# Altium PCB PCB_GTV3.5.PcbDoc (part 10 of 11)
Units mil, origin at the board's own origin, x right, y up, seen from the top; angles counter-clockwise.
Board outline 8070.87 x 4881.89 mil, 4 copper layers (Top Layer, GND, PWR, Bottom Layer), stack 61.653 mil thick; 490 components, 296 nets, 1533 pads, 845 vias.
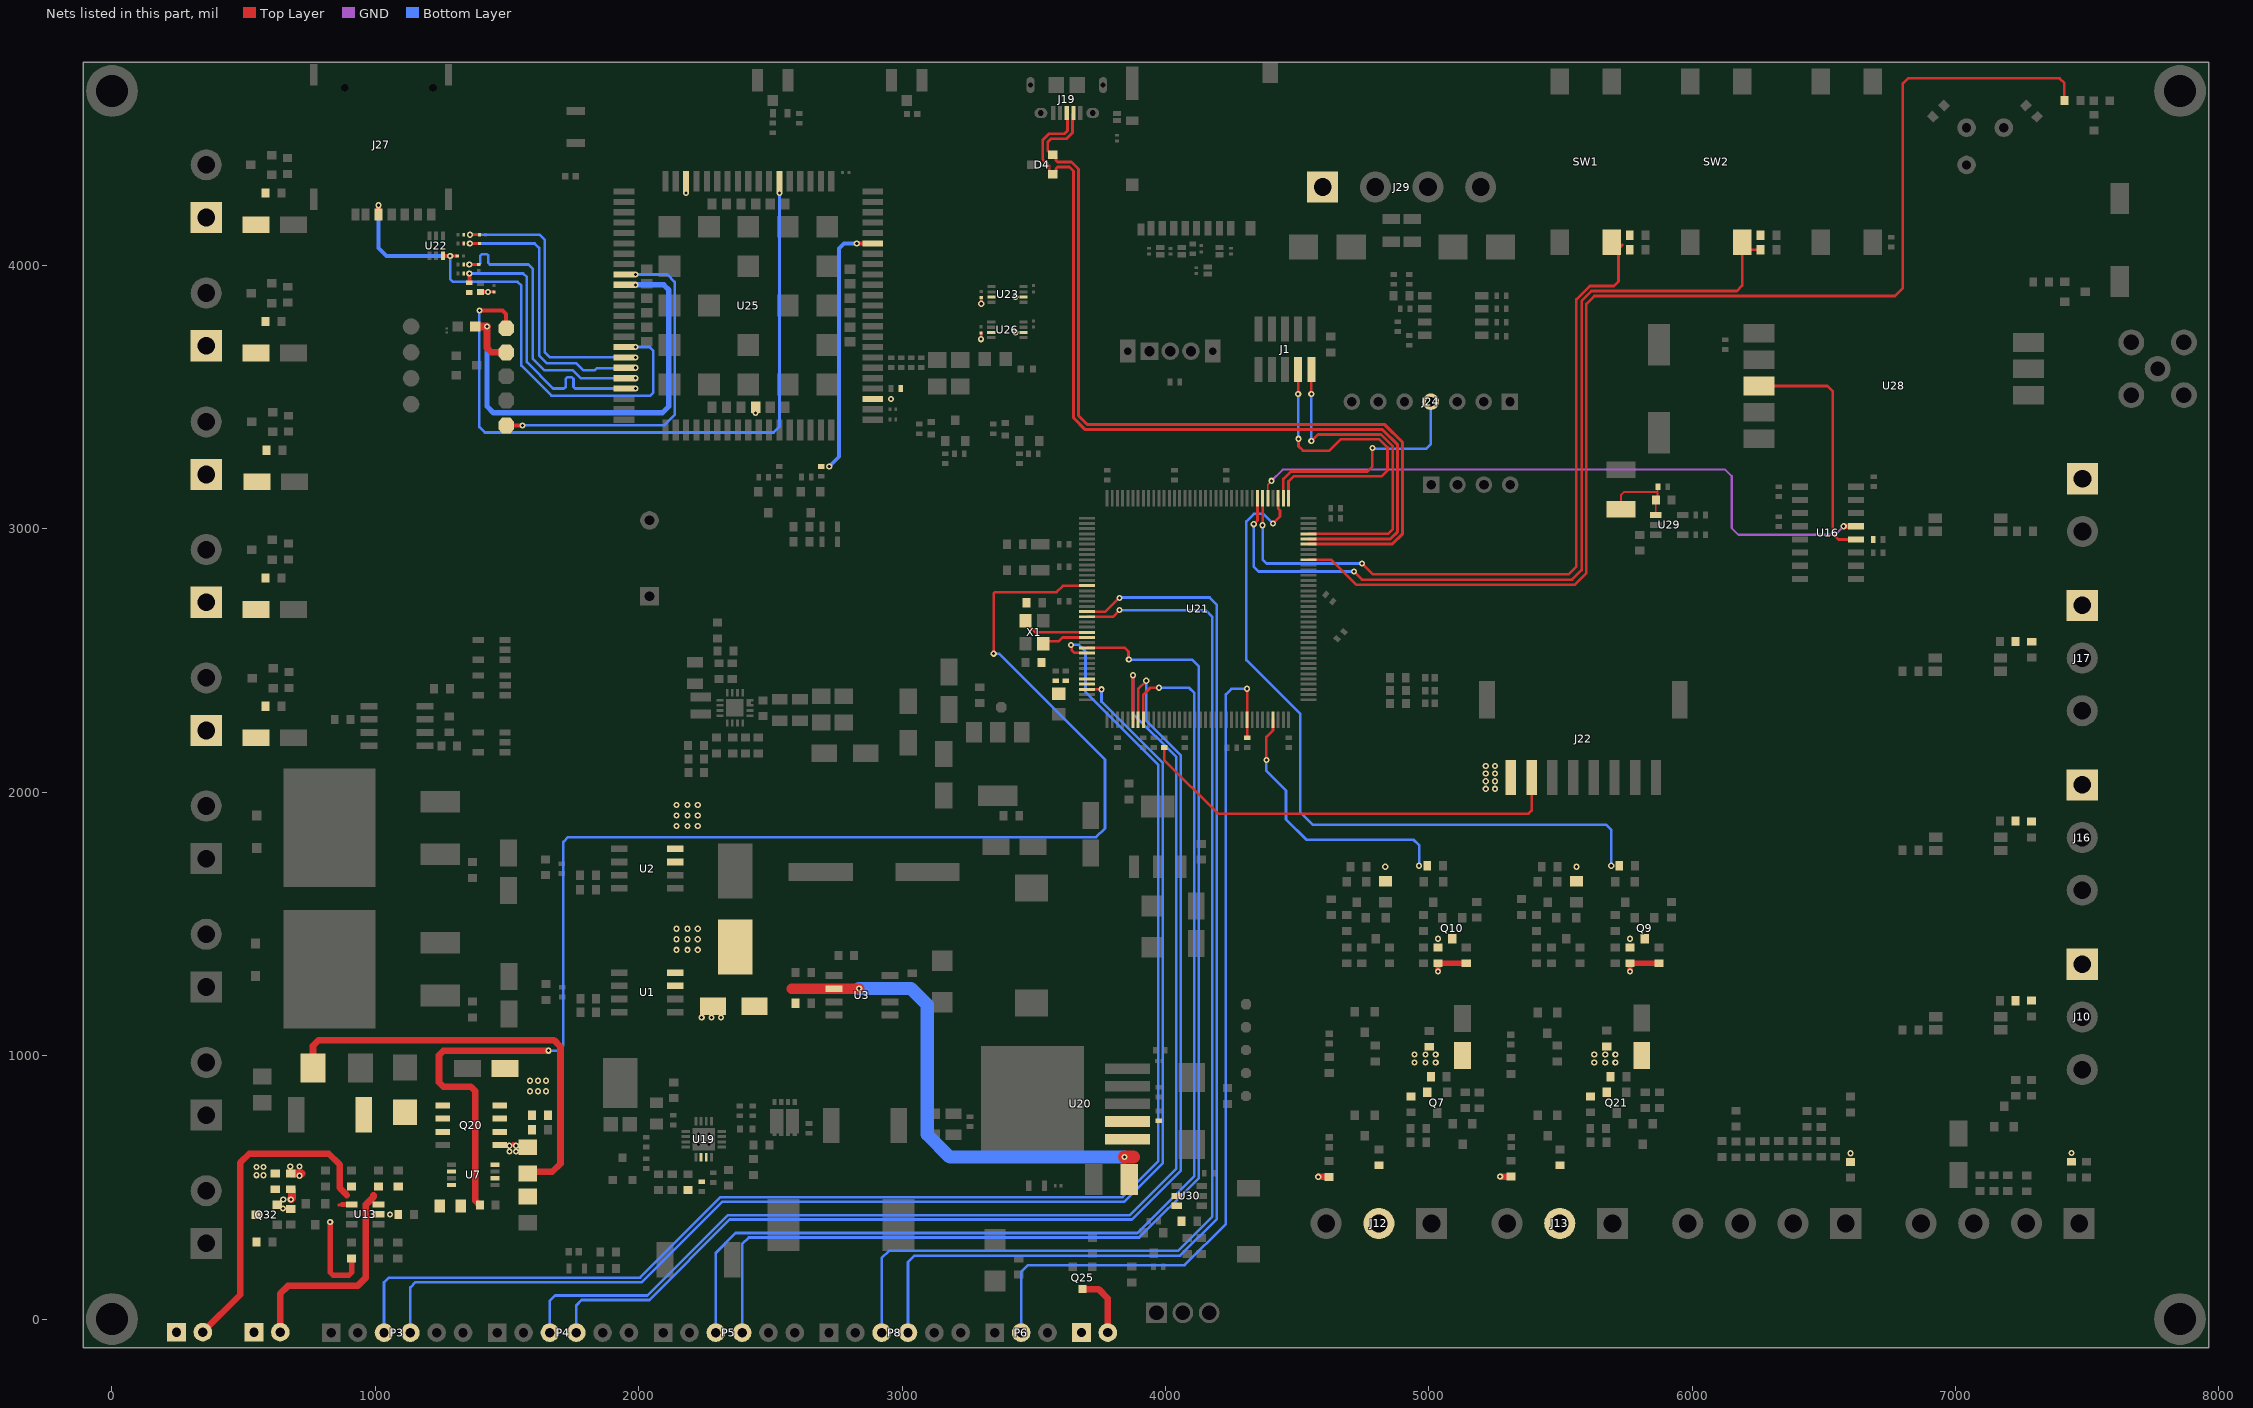
[diagram p7: the nets of this part, all layers, seen from the top]

## Via types
v1: diameter 23.62, hole 11.81, Top Layer to Bottom Layer, tented both sides, 444 vias
v2: diameter 23.62, hole 11.81, Top Layer to Bottom Layer, 401 vias

## Nets (pads, with @x,y where several pads share a name; then routed paths per layer and width w, separated by ;. In a path a pad name is that pad's centre, name@x,y a point inside that pad or via, vN(x,y) a via of type N, cw(c..) or ccw(c..) an arc to the next point about the centre after c; other vN are vias at no path point) (continued)
SHDN: R64.2 SB7.2 U21.14 | length 5477.9
  Top Layer w10: v2(3347.8,2526.46) 3347.8,2754.01 3353.66,2759.87 3586.62,2759.87 3610.86,2784.11 3701.88,2784.11 U21.14@3702.4,2784.62
  Top Layer w25: SB7.2@1396.98,433.4 1395.87,433.4 1379.87,449.4 1379.87,865.03 1362.87,882.03 1258.86,882.03 1241.87,899.02 1241.87,1002.03 1258.87,1019.03 v2(1657.87,1019.03)
  Bottom Layer w10: v2(1657.87,1019.03) 1694.87,1019.03 1713.87,1038.03 1713.87,1811.76 1732.1,1830 3736.86,1830 3770.3,1863.44 3770.3,2124.7 3368.54,2526.46 v2(3347.8,2526.46)
SIGNALS.TX: U16.13 U21.113 | length 2538.9
  Top Layer w7: U21.113@4388.62,3116.51 4388.62,3168.41 v2(4402.79,3182.58)
  Top Layer w20: v1(6575,3010) U16.13@6621.3,3010
  GND w8: v2(4402.79,3182.58) 4445.21,3225 6125,3225 6150,3200 6150,3003.04 6175,2978.04 6543.04,2978.04 v1(6575,3010)
SIM_CD: R144.2 R152.2 U25.34 | length 1107.3
  Top Layer w15: R144.2@1356.87,3935.03 v1(1356.88,3970.03)
  Bottom Layer w10: v1(1356.88,3970.03) 1561.01,3970.03 1575.06,3955.99 1575.06,3633.41 1675.42,3533.05 1711.38,3533.05 1716.38,3533.05 1722.38,3539.05 1722.38,3569.59 1728.38,3575.59 1746.38,3575.59 1752.38,3569.59 1752.38,3539.05 1758.38,3533.05 1829.93,3533.05 v1(1988.26,3533.05)
SIM_CLK: C99.2 R151.2 U25.32 | length 1108.6
  Top Layer w10: R151.2@1335.69,4083.41 R151.2@1335.73,4083.45 ; v1@1358.55,4083.72 1358.87,4084.03 1358.96,4083.94 C99.2@1394.96,4083.94 ; v1(1358.87,4083.5) v1(1358.87,4083.5)
  Bottom Layer w10: v1(1358.87,4083.5) 1605.02,4083.5 1621.72,4066.8 1621.72,3658.83 1651.99,3628.56 1763.16,3628.56 1789.72,3602 1833,3602 1841.72,3610.72 1987.19,3610.72 v1(1988.26,3611.79)
SIM_DATA: C98.2 R153.2 U25.31 | length 1108.3
  Top Layer w10: v1(1358.96,4117.12) C98.2@1394.96,4117.12
  Bottom Layer w10: v1(1358.96,4117.12) 1623.95,4117.12 1643.02,4098.05 1643.02,3671.22 1663.04,3651.2 v1(1988.26,3651.16)
SIM_RST: C100.2 R150.2 U25.33 | length 1110.3
  Top Layer w10: v1(1356.88,4004.03) C100.2@1392.87,4004.03
  Bottom Layer w10: v1(1356.88,4004.03) 1388,4004.03 1393,4004.03 1399,4010.03 1399,4037.37 1405,4043.37 1423,4043.37 1429,4037.37 1429,4010.03 1435,4004.03 1440.99,4004.03 1580.82,4004.03 1598.12,3986.74 1598.12,3646.11 1642.23,3602 1750.02,3602 1779.6,3572.42 v1(1988.26,3572.42)
SIM_VDD: C101.1 J27.C1 U22.6 U25.30 | length 1995.4
  Top Layer w10: J27.C1@1011.87,4193.96 J27.C1@1011.93,4193.9 ; v2(1284.15,4036.05) 1284.55,4036.45 1307.14,4036.45 C101.1@1307.54,4036.85
  Top Layer w15: U22.6@1256.46,4036.85 1256.83,4036.45 1283.75,4036.45 v2(1284.15,4036.05)
  Top Layer w20: J27.C1@1011.87,4193.96 v2(1011.87,4229.03)
  Bottom Layer w10: v2(1284.15,4036.05) 1284.15,3948.8 1294.98,3937.97 1539.88,3937.97 1554.44,3923.41 1554.44,3620.32 1668.76,3506 2044.04,3506 2055.52,3517.48 2055.52,3676.49 2041.48,3690.53 v1(1988.26,3690.53)
  Bottom Layer w15: v2@1011.87,4234.03 v2(1011.87,4229.03) 1011.87,4067.03 1042.85,4036.05 v2(1284.15,4036.05)
SNS_IN: SB3.2 U21.100 | length 4833.3
  Top Layer w10: U21.100@4543.34,2883.04 4629.37,2883.04 4724.09,2788.33 5554.18,2788.33 5598.04,2832.19 5598.04,3854.14 5628.41,3884.51 6770.04,3884.51 6799.98,3914.45 6799.98,4691.15 6819.86,4711.03 7394.87,4711.03 7412.87,4693.03 7412.87,4633.03 SB3.2@7417.87,4628.03
SPI_NFC.SS_NFC: J24.4 U21.110 | length 891.6
  Top Layer w10: U21.110@4447.67,3116.51 4447.67,3189.45 4476.22,3218 4767,3218 4785.6,3236.6 v1(4785.6,3306.81)
  Bottom Layer w10: v1(4785.6,3306.81) 4787.57,3304.83 4990.27,3304.83 5007.87,3322.44 J24.4@5007.87,3483.03
STATUS: R138.1 U25.66 | length 980.1
  Top Layer w15: v1(2828.03,4083.4) 2828.46,4083.83 2866.05,4083.83 2866.48,4084.25 U25.66@2888.7,4084.25
  Bottom Layer w15: v2(2723.49,3237) 2760.61,3274.12 2760.61,4064.9 2779.96,4084.25 2827.18,4084.25 v1(2828.03,4083.4)
SW_1: C37.2 R18.1 SW1.3 U21.114 | length 2806.2
  Top Layer w10: v1(4368.93,3013.84) U21.114@4368.93,3116.51 ; v1(4746.39,2868.87) 4787.97,2827.29 5530.88,2827.29 5560.21,2856.62 5560.21,3871.36 5611.45,3922.61 5702.61,3922.61 5720,3940 5720,4062.9 5735,4077.9
  Bottom Layer w10: v1(4368.93,3013.84) 4368.93,2884.44 4384.5,2868.87 v1(4746.39,2868.87)
SW_2: C38.2 R19.1 SW2.3 U21.115 | length 3471.5
  Top Layer w10: v1(4335.07,3018) 4349.25,3032.17 U21.115@4349.25,3116.51 ; v1(4715.56,2838.16) 4746.39,2807.33 5213.47,2807.33 ; 5213.5,2807.29 5543.97,2807.29 5580.21,2843.53 5580.21,3866.2 5617.27,3903.26 6169.45,3903.26 6189.63,3923.43 SW2.3@6189.63,4060.4 ; SW2.3@6189.63,4088.44 SW2.3@6189.63,4063.83 ; SW2.3@6214.23,4088.44 SW2.3@6189.63,4063.83 ; C38.2@6259.27,4060.4 SW2.3@6189.63,4060.4 ; SW2.3@6189.63,4060.4 SW2.3@6189.63,4063.83
  Bottom Layer w10: v1(4335.07,3018) 4335.07,2856.72 4353.63,2838.16 v1(4715.56,2838.16)
SWCLK: J1.4 U21.109 | length 1214.1
  Top Layer w10: U21.109@4467.36,3116.51 4467.36,3180.59 4486.76,3200 4820.43,3200 4843,3222.57 4843,3309.67 4811.55,3341.12 4666.12,3341.12 4622.21,3297.21 4521.71,3297.21 4505,3313.91 v1(4505,3342) ; v1(4503.87,3511.85) J1.4@4503.87,3606.03
  Top Layer w25: J1.4@4503.87,3606.03 J1.4@4504.68,3605.22
  Bottom Layer w10: v1(4503.87,3511.85) 4504.43,3511.28 4504.43,3342.57 v1(4505,3342)
SWDIO: J1.2 U21.105 | length 1251.5
  Top Layer w10: U21.105@4543.34,2981.47 4845.43,2981.47 4862.43,2998.46 4862.43,3314.28 4818.28,3358.43 4579.08,3358.43 4554.27,3333.62 v2(4553.87,3333.62) ; v1(4553.87,3511.85) J1.2@4553.87,3606.03
  Bottom Layer w10: v2(4553.87,3333.62) v1(4553.87,3511.85)
TDS_1: P3.4 U21.34 | length 5174.2
  Top Layer w10: U21.34@3702.4,2390.92 v1(3757,2390.92)
  Bottom Layer w10: P3.4@1133.12,-51.43 1133.12,120.29 1153.18,140.35 2011.97,140.35 2317.49,445.86 3843.89,445.86 3990.22,592.19 3990.22,2111.23 3757,2344.44 v1(3757,2390.92)
TDS_2: P3.3 U21.27 | length 5520.7
  Top Layer w10: v1(3641,2559.69) 3643.61,2557.08 3643.61,2541.14 3655.52,2529.22 3701.88,2529.22 U21.27@3702.4,2528.71
  Bottom Layer w10: P3.3@1033.12,-51.43 1033.12,139.29 1051.18,157.35 2004.93,157.35 2310.45,462.86 3836.85,462.86 3973.22,599.23 3973.22,2104.18 3696.16,2381.24 3696.16,2534.86 3671.33,2559.69 v1(3641,2559.69)
TDS_3: P4.4 U21.43 | length 4685
  Top Layer w10: U21.43@3896.49,2275.56 3896.49,2392.71 v1(3927.15,2423.37)
  Bottom Layer w10: P4.4@1762.87,-51.43 1762.87,52.04 1783.18,72.35 2040.14,72.35 2345.65,377.86 3872.05,377.86 4058.22,564.03 4058.22,2140.6 3927.15,2271.67 v1(3927.15,2423.37)
TDS_4: P4.3 U21.42 | length 4817.7
  Top Layer w10: U21.42@3876.8,2275.56 v1(3876.8,2444.46)
  Bottom Layer w10: P4.3@1662.87,-51.43 1662.87,70.03 1682.18,89.35 2033.1,89.35 2338.61,394.86 3865.01,394.86 4041.22,571.07 4041.22,2133.56 3876.8,2297.97 v1(3876.8,2444.46)
TDS_5: P5.4 U21.26 | length 4585.7
  Top Layer w10: U21.26@3702.4,2548.4 3845.53,2548.4 3859.7,2534.22 3859.7,2505.3 v1(3861,2504)
  Bottom Layer w10: P5.4@2392.62,-51.43 2392.62,284.27 2418.21,309.86 3900.22,309.86 4126.57,536.21 4126.57,2477.32 4099.9,2504 v1(3861,2504)
TDS_6: P5.3 U21.44 | length 4382.6
  Top Layer w10: U21.44@3916.17,2275.56 3916.17,2370.93 3942.25,2397 v1(3975,2397)
  Bottom Layer w10: P5.3@2292.62,-51.43 2292.62,251.79 2367.69,326.86 3893.18,326.86 4109.57,543.25 4109.57,2377.2 4089.78,2397 v1(3975,2397)
TDS_7: P8.4 U21.19 | length 4366.5
  Top Layer w10: U21.19@3702.4,2686.19 3771.47,2686.19 3823.34,2738.06 v1(3825.91,2738.06)
  Bottom Layer w10: P8.4@3022.37,-51.43 3022.37,216.01 3047.34,240.99 4055.78,240.99 4195.22,380.43 4195.22,2712.09 4167.57,2739.74 3827.59,2739.74 v1(3825.91,2738.06)
TDS_8: P8.3 U21.20 | length 4377
  Top Layer w10: U21.20@3702.4,2666.51 3800.8,2666.51 v1(3826,2691.7)
  Bottom Layer w10: P8.3@2922.37,-51.43 2922.37,230.97 2950.14,258.75 4047.25,258.75 4177.87,389.37 4177.87,2666.44 4152.61,2691.7 v1(3826,2691.7)
TDS_IN.TEMP_SNS: P6.2 R31.2 U21.64 | length 3368.7
  Top Layer w10: R31.2@4309.88,2207.5 U21.64@4309.88,2275.56 v1(4309.88,2393)
  Bottom Layer w10: P6.2@3452.12,-51.43 3452.12,179.22 3477.54,204.64 4072.51,204.64 4229.22,361.35 4229.22,2372.08 4250.14,2393 v1(4309.88,2393)
TX#: R55.1 U16.12 U28.3 | length 926.3
  Top Layer w10: U28.3@6253.18,3542.69 6513.82,3542.69 6533.07,3523.44 6533.07,2982.62 6555.69,2960 U16.12@6621.3,2960
TXIN1: R47.2 U21.69 | length 1043.4
  Top Layer w10: v2(4383.1,2123.01) 4383.1,2209.8 4408.3,2235 U21.69@4408.3,2275.56
  Bottom Layer w10: v2(4383.1,2123.01) 4383.1,2081.3 4457.82,2006.59 4457.82,1897.61 4535.53,1819.89 4942.25,1819.89 4963.06,1799.08 v2(4963.06,1721.03)
TXIN2: R46.2 U21.111 | length 2771.6
  Top Layer w10: v1(4408.3,3020.84) 4435.11,3047.65 4435.11,3070.13 4427.99,3077.25 U21.111@4427.99,3116.51
  Bottom Layer w10: v1(4408.3,3020.84) 4371.84,3057.3 4336.02,3057.3 4307.16,3028.44 4307.16,2501.8 4511.83,2297.13 4511.83,1924.2 4559.14,1876.89 5672.86,1876.89 5692.69,1857.05 v2(5692.69,1721.03)
UART_LOG_TX: P12.1 U25.23 | length 1321.1
  Top Layer w15: P12.1@1497,3393 v1(1558.43,3393)
  Bottom Layer w10: v1(1558.43,3393) 2096.14,3393 2136.52,3433.38 2136.52,3938.48 2108.88,3966.12 v1(1988.26,3966.12)
USB_BOOT: P2.1 U25.6 | length 2648.3
  Top Layer w10: P2.1@1496.26,3762.39 P2.1@1497,3761.64
  Top Layer w15: v1(1395,3829) 1483.26,3829 1496.26,3816 P2.1@1496.26,3762.39
  Bottom Layer w10: v1(1395,3829) 1395,3386.7 1415.51,3366.19 2512.2,3366.19 2534.35,3388.33 v1(2534.35,4276.03)
USB_D_N: D4.2 J19.2 U21.103 | length 3299
  Top Layer w11: J19.2@3650.98,4579.07 3648.21,4576.31 3648.21,4552.08 3647.68,4551.56 3647.68,4505.92 3647.68,4505.17 3624.14,4481.63 3565.4,4481.63 3553.14,4469.38 3553.14,4436.78 3559.61,4430.31 3563.54,4430.31 3583.86,4409.99 3583.86,4399.18 3590.31,4392.73 3643.54,4392.73 3669.5,4366.78 3669.5,3429.96 3703.58,3395.89 4832.44,3395.89 4900.63,3327.7 4900.63,2981.64 4861.43,2942.44 4568.88,2942.44 4568.54,2942.1 U21.103@4543.34,2942.1
USB_D_P: D4.1 J19.3 U21.104 | length 3318.7
  Top Layer w11: J19.3@3625.39,4579.07 3628.16,4576.31 3628.16,4552.08 3628.68,4551.56 3628.68,4513.79 3628.68,4513.04 3616.27,4500.63 3557.53,4500.63 3534.14,4477.25 3534.14,4402.97 3558.64,4378.47 3558.64,4356.47 3569.29,4345.83 3573.22,4345.83 3583.86,4356.47 3583.86,4367.29 3590.31,4373.73 3635.67,4373.73 3650.5,4358.91 3650.5,3422.09 3695.71,3376.89 4824.57,3376.89 4881.63,3319.83 4881.63,2989.51 4853.56,2961.44 4568.88,2961.44 4568.54,2961.78 U21.104@4543.34,2961.78
USB_VBUS: F1.1 P15.1 U25.24 | length 1795.2
  Top Layer w10: P15.1@1496.26,3671 P15.1@1497,3670.26
  Top Layer w25: v2(1423.94,3768.61) 1423.94,3687.06 1440,3671 P15.1@1496.26,3671
  Top Layer w30: F1.1@1380.06,3768.61 v2(1423.94,3768.61)
  Bottom Layer w20: v2(1423.94,3768.61) 1423.94,3466.01 1449.19,3440.76 2089.24,3440.76 2114.52,3466.05 2114.52,3907.33 2095.11,3926.75 v1(1988.26,3926.75)
VCC: C24.1 C25.1 C43.1 C45.1 C46.1 C47.1 C58.1 C59.1 C61.1 C62.1 C63.1 C64.1 C65.1 C66.1 C67.1 C68.1 J5.1 J6.1 J7.1 J8.1 J9.1 J10.1 J11.1 J16.1 J17.1 J22.7 J22.8 J29.1 P19.1 Q7.2 Q21.2 R12.2 R27.2 R36.2 R37.2 R38.2 R39.2 R40.2 R41.2 R50.2 R51.2 R68.2 R77.2 R78.2 SB2.1 SB5.1 SB8.1 SB40.2 SB44.1 U1.3 U1.4 U2.3 U2.4 | length 2016.5
  Top Layer w10: R12.2@3994.91,2170.5 3994.91,2123.1 4199.38,1918.63 5378.32,1918.63 5390.17,1930.48 J22.7@5390.17,2056.03 ; R51.2@4621.15,540 R51.2@4621.23,539.92
  Top Layer w20: v1(5035,1320) R41.2@5035.03,1351.03 ; R41.2@5035.03,1351.03 C47.1@5142.11,1351.03 ; v1(5763.84,1320) R40.2@5763.87,1351.03 ; R40.2@5763.87,1351.03 C46.1@5870.95,1351.03
  Top Layer w25: v1(4580,540) R51.2@4621.15,540 ; v1(5270.71,540.92) R50.2@5311.87,540.92
  other v1: 1586.98,865.03 1617.48,865.03 1647.98,865.03 1586.98,905.03 1617.48,905.03 1647.98,905.03 4945.94,974.03 4987.41,974.03 5025.91,974.03 5628.17,974.03 5669.64,974.03 5708.14,974.03 4945.94,1004.03 4987.41,1004.03 5025.91,1004.03 5628.17,1004.03 5669.64,1004.03 5708.14,1004.03 2144,1402 2185,1402 2224,1402 2144,1442 2185,1442 2224,1442 2144,1482 2185,1482 2224,1482 2144,1872 2185,1872 2224,1872 2144,1912 2185,1912 2224,1912 2144,1952 2185,1952 2224,1952
  other v2: 6600.76,629.69 7439.87,630.05 5216.03,2013.18 5250.87,2013.18 5216.03,2042.11 5250.87,2042.11 5216.03,2071.03 5250.87,2071.03 5216.03,2099.96 5250.87,2099.96
VCC5V: C72.2 C74.2 D31.2 U29.1 | length 289.6
  Top Layer w7: D31.2@5730,3075.2 5730,3130 5740,3140 5863.75,3140 5867.75,3144 C72.2@5867.75,3109.38 ; U29.1@5861.57,3052.85 5861.57,3109.21 C72.2@5861.75,3109.38
VCC#12: D11.2 Q32.3 R34.1 SB39.2
  other v1: 2239,1145 2276,1145 2312,1145
  other v2: 575,546 548.4,546.28 575,577 548.4,577.28
VCC##12: C9.1 C77.2 C90.2 C91.1 D11.1 R3.2 U3.6 U20.1 U20.2 U30.2 U30.3 | length 1845.1
  Top Layer w10: 3878.2,615.03 3880.96,617.8 3880.96,620.61
  Top Layer w40: 2581.7,1254.61 U3.6@2741.39,1254.61 ; U3.6@2752.88,1254.61 v2(2837,1254.61)
  Top Layer w50: v2(3844.87,615.03) 3878.2,615.03
  Bottom Layer w50: v2(2837,1254.61) 3034.38,1254.61 3095.76,1193.22 3095.76,700.72 3181.45,615.03 v2(3844.87,615.03)
VCC#M: D6.1 Q20.1 Q20.2 Q20.3 R64.1 R149.1 U7.2 U7.4
VCC#P: C1.1 C3.1 C56.2 Q20.5 Q20.6 Q20.7 Q20.8 SB9.1 SB40.1 U7.8 | length 54.6
  Top Layer w10: v2@1514.87,658.03 1525.06,668.22
  Top Layer w30: SB9.1@678.87,553.03 v2@719.1,553.03
  other v2: 712.1,544.03 676.82,578.96 712.1,578.96 1509,636 1534.19,636 1508.87,658.03 1534.06,658.03
VCC_M: C69.1 Q32.2 R11.2 R71.1 R82.1 SB9.2 SB39.1 U13.5 | length 376.7
  Top Layer w10: SB9.2@678.87,493.03 SB9.2@682.94,488.96
  Top Layer w20: v2(828.54,368.09) 828.54,177.75 840.26,166.03 899.15,166.03 910.87,177.75 910.87,229.41 R11.2@909.82,230.46
  Top Layer w30: v2@679.14,455.11 682.94,458.91 SB9.2@682.94,488.96
  other v2: 1055.87,397.03 649.92,419.93 650.26,453.96 679.14,453.96
VDD_EXT: C27.1 C94.1 C103.1 C105.1 D27.2 R144.1 U23.3 U23.6 U25.15 U25.97 U25.116 U26.3 U26.6 | length 119.2
  Top Layer w10: D27.2@1399.75,3899.8 D27.2@1399.84,3899.9 ; v1@1427.9,3899.9 1428.09,3900.09 1449.91,3900.09 C27.1@1450,3900.19 ; v1(2443.82,3440.55) U25.116@2443.82,3462.21 ; v1(3300,3720.6) C105.1@3300,3744.19 ; v1(3300.41,3854.78) C103.1@3300.41,3878.37
  Top Layer w15: D27.2@1399.84,3899.9 v1@1427.9,3899.9
  other v1: 2958.32,3493.7 3430.11,3746.19 3430.11,3880.37 1428,3900 2180.02,4276.03
VDDA: C7.1 C113.1 L1.2 U21.32 U21.33
VOUT_A: P27.1 P27.2 R117.2 U13.1 | length 1275
  Top Layer w10: 861.87,432.83 861.87,433.46
  Top Layer w20: 873.58,434.59 909.38,434.59 U13.1@909.82,435.03
  Top Layer w25: P27.2@345.12,-49.43 487.22,92.67 487.22,594.25 521,628.03 822.87,628.03 864.58,586.33 864.58,498.19 891.87,470.89
VOUT_B: P28.1 P28.2 R118.2 U13.6 | length 821.8
  Top Layer w25: P28.2@639.12,-49.43 639.12,96.84 668.32,126.03 932.75,126.03 964.25,157.53 964.25,435.21 993.05,464.01 993.05,470.89
VREF: C86.2 R122.2 U19.6 U19.7
VSS: C56.1 D7.1 R65.2 U7.6 | length 1627
  Top Layer w25: D7.1@763.32,954.03 763.32,1037.48 784.87,1059.03 1677.87,1059.03 1703.02,1033.88 1703.02,590.02 1672.03,559.03 1584.62,559.03 C56.1@1577.98,552.4
W_LED: P19.2 Q25.3 | length 240.3
  Top Layer w25: Q25.3@3685.11,114.49 3685.74,113.86 3745.25,113.86 3781.12,77.99 P19.2@3781.12,-51.18
WBUS1: J12.2 Q10.3 R41.1 R90.1 R95.2
  other v2: 5035.03,1444.19 4834.31,1717.53
WBUS2: J13.2 Q9.3 R40.1 R89.1 R96.2
  other v2: 5763.87,1444.19 5560.87,1717.53
XIN: C34.2 U21.23 X1.1 | length 259
  Top Layer w10: X1.1@3465.5,2649.26 3468.76,2645.99 3468.76,2645.86 3488.32,2626.31 3488.45,2626.31 3507.3,2607.45 U21.23@3702.4,2607.45 ; X1.1@3468.69,2645.93 X1.1@3468.69,2650.61
XOUT: C35.2 U21.24 X1.3 | length 176.6
  Top Layer w10: X1.3@3535.62,2564 3545.22,2573.59 3595.5,2573.59 3609.67,2587.77 U21.24@3702.4,2587.77
pads on no net: ANT1.2 J1.6 J1.7 J1.8 J19.4 J22.3 J22.6 J27.C6 J27.MH J30.1 J30.8 SW1.2 SW1.4 SW2.2 SW2.4 SW3.2 SW3.4 SW4.MH1 SW4.MH2 U7.3 U7.7 U10.1 U11.1 U12.1 U21.11 U21.12 U21.48 U21.49 U21.50 U21.53 U21.57 U21.58 U21.63 U21.66 U21.67 U21.86 U21.90 U21.91 U21.92 U21.96 U21.97 U21.98 U21.106 U21.126 U21.127 U21.128 U21.129 U21.132 U25.3 U25.4 U25.5 U25.7 U25.8 U25.11 U25.12 U25.13 U25.14 U25.19 U25.20 U25.21 U25.22 U25.25 U25.26 U25.35 U25.36 U25.37 U25.38 U25.40 U25.41 U25.42 U25.43 U25.44 U25.47 U25.48 U25.49 U25.50 U25.51 U25.53 U25.67 U25.68 U25.100 U25.101 U25.102 U25.103 U25.104 U25.105 U25.106 U25.107 U25.108 U25.109 U25.110 U25.111 U25.112 U25.113 U25.114 U25.115 U25.117 U25.118 U25.119 U25.120 U25.121 U25.122 U25.123 U25.124

## Polygon pours and split planes (outlines as drawn)
GND on Bottom Layer "GND_L04_P039" (solid, remove dead copper, pour order 39): -109.33,-109.43 -109.33,4772.46 7961.54,4772.46 7961.54,-109.43
VCC_M on Bottom Layer "VCC_M_L04_P041" (solid, pour order 41): 633.4,476.46 714.79,476.46 756.66,434.59 1055.37,434.59 1084.06,405.9 1084.06,366.06 1071,353 640.73,353 627.94,365.8 627.94,471
BAT on Bottom Layer "BAT_L04_P037" (solid, pour order 37): 1590,628.03 1590,687.74 1574.32,703.42 1391.31,703.42 1315.93,628.03 616.97,628.03 593.79,651.21 593.79,777.27 612.52,796 1663.92,796 1767.32,899.4 1941.23,899.4 2119.83,1078 3006,1078 3038,1046 3038,613.06 2923,613.06 2923,927 2904,946 2198.91,946 2032.91,780 1851.32,780 1699.35,628.03
VCC#P on Bottom Layer "VCC#P_L04_P040" (solid, remove dead copper, pour order 40): 655.4,609.5 629.97,584.07 629.97,516.03 638.91,507.09 689.87,507.09 749.72,447.24 1527.24,447.24 1554.25,474.25 1554.25,658.12 1529.97,682.4 1399.76,682.4 1326.86,609.5
AGND on Bottom Layer "AGND_L04_P016" (solid, remove dead copper, pour order 16): 2276.33,732.93 2291.54,717.71 2291.54,502.52 2236.8,502.52 2236.8,561.03 2107.76,561.03 2107.76,447.03 1880.87,447.03 1880.87,718.8 1895,732.93
WBUS2 on Bottom Layer "WBUS2_L04_P034" (solid, pour order 34): 5497,1506.36 5497,1444.27 5473.39,1420.66 5409,1420.66 5409,541 5409,293 5428,274 5570,274 5590,294 5590,1347 5601.57,1358.57 5774.41,1358.57 5784.81,1368.98 5784.81,1473.22 5776.03,1482 5590.06,1482 5579.95,1492.11 5581.55,1734.45 5572,1744 5506.67,1744 5497,1734.33
VCC#12 on Bottom Layer "VCC#12_L04_P038" (solid, pour order 38): 589,518 599.11,528.11 599.11,801.31 611.8,814 1656,814 1759,917 1923.32,917 2101.32,1095 2357,1095 2397.42,1135.42 2397.42,1258.58 2382.58,1273.42 1868.42,1273.42 1849,1254 1849,1018.15 1832.85,1002 478,1002 457,981 457,527 466,518
5V on Bottom Layer "5V_L04_P036" (solid, pour order 36): 6036,3429 7806,3429 7848,3387 7848,529 7804,485 7387,485 7344,528 7344,773 7386.57,815.57 7545.57,815.57 7597,867 7597,3266 7570,3293 6036,3293 6019.38,3309.62 6019.38,3412.38
3V3 on Bottom Layer "3V3_L04_P035" (solid, pour order 35): 4526.87,982.13 4558,951 4734,951 4734,912.34 4542.27,912.34 4526.87,896.93 4526.87,825 4526.87,50.87 4376,-100 3477.54,-100 3477.54,162 3520.18,204.64 3599.39,204.64 3686.03,118 4314,118 4351,155 4351,1287 4375,1311 4500,1311 4526.87,1284.13
WBUS1 on Bottom Layer "WBUS1_L04_P032" (solid, pour order 32): 4786.38,1744 4774.1,1731.72 4774.1,1527.1 4722,1473 4722,541 4722,293 4741,274 4883,274 4903,294 4903,1347 4914.57,1358.57 5087.41,1358.57 5097.81,1368.98 5097.81,1473.22 5089.03,1482 4910,1482 4893,1499 4894.53,1731.47 4882,1744
5V-LED on Top Layer "5V-LED_L01_P015" (solid, pour order 15): 3926.63,166.5 3992,166.5 3992,262.22 4162.44,262.22 4185.72,285.5 4449,285.5 4449,85 4005.37,85 4005.37,-15.37 3926.63,-15.37
NetC75_1 on Top Layer "NETC75_1_L01_P029" (solid, pour order 29): 4105.51,455.52 4157.44,455.52 4195.96,417 4428,417 4449,438 4449,546 4428,567 4165.75,567 4165.75,487.46 4157.44,479.14 4105.51,479.14 4157.44,479.14 4105.51,479.14
GND on Top Layer "GND_L01_P059" (solid, remove dead copper, pour order 59): -109.33,-7.73 -109.33,4772.46 7961.54,4772.46 7961.54,-109.43 -7.62,-109.43
CRNT_SNS.IP+_1 on Top Layer "CRNT_SNS.IP+_1_L01_P031" (solid, remove dead copper, pour order 31): 1350.87,1517.82 2067.87,1517.82 2067.87,1228.08 2171,1228.08 2171,1152.49 1997.64,1152.49 1997.64,1387.61 1350.87,1387.61
CRNT_SNS.IP+_2 on Top Layer "CRNT_SNS.IP+_2_L01_P058" (solid, remove dead copper, pour order 58): 1350.87,1987.82 2067.87,1987.82 2067.87,1698.08 2171,1698.08 2171,1622.49 1997.64,1622.49 1997.64,1860 1350.87,1860
PGND on GND "PGND_L02_P042" (solid, pour order 42): 2108,2446.47 2108,2812.47 1927,2812.47 1927,3139 2261,3139 2261,3033 2954.53,3033 2954.53,2329.25 2953.87,2329.91 2657.47,2329.91 2657.47,2811.84 2252.14,2811.84 2252.14,2446.47
GND on GND "GND_L02_P044" (solid, pour order 44): -109.33,-109.43 7961.54,-109.43 7961.54,4772.46 -109.33,4772.46
3V3 on PWR "3V3_L03_P056" (solid, pour order 56): 3778.93,4506 3775,4502.07 3775,3914.91 3780.27,3914.91 3827.18,3868 4382.06,3868 4424,3826.06 4424,3440.34 4459.97,3404.38 4904.62,3404.38 5019,3290 5978.77,3290 6019.38,3330.61 6019.38,3751.91 6044.47,3777 6188.94,3777 6211.44,3754.49 6211.44,3099.12 6161.33,3049 5295.42,3049 5295.42,2500.42 4884,2089 3004,2089 3004,1792 3047.2,1748.8 3156,1748.8 3190.55,1783.35 4116.22,1783.35 4143.11,1756.46 4144.85,1756.46 4144.85,1191.23 4184.52,1151.56 4467.44,1151.56 4526.87,1092.13 4526.87,908 4818,908 4818,1336.22 4848.78,1367 5089,1367 5135,1413 5135,2120 5184,2169 5569,2169 5607,2131 5607,1409 5635,1381 5809.42,1381 5853,1337.42 5853,979 5793,919 5574,919 5520.91,972.09 5520.91,1229.85 5486.76,1264 5164.91,1264 5132.16,1231.26 5132.16,714.01 5193.17,653 5929,653 6139.03,863.03 7315.23,863.03 7356,903.81 7356,1159 7315,1200 6450,1200 6395,1255 6395,1614 6446,1665 6963.87,1665 7028,1729.13 7028,3384.37 7064.63,3421 7462.12,3421 7501,3459.88 7501,3882 7462,3921 7359,3921 7329,3951 7329,4571.27 7303.27,4597 7141,4597 7117,4573 7117,4248.63 7081.37,4213 5352,4213 5281.54,4142.54 4464.46,4142.54 4428,4179 4428,4464 4386,4506
VCC on PWR "VCC_L03_P057" (solid, pour order 57): -109.33,-109.43 7961.54,-109.43 7961.54,4772.46 -109.33,4772.46
VDD_EXT on PWR "VDD_EXT_L03_P043" (solid, pour order 43): 866,3324 826,3364 826,4416 865,4455 1830,4455 1866.19,4418.81 1866.19,4174.87 1905.63,4135.44 2086.06,4135.44 2126,4175.37 2126,4315.18 2153.85,4343.03 2264.36,4343.03 2287,4320.4 2287,4038.91 2326.91,3999 2843.99,3999 2879.38,3963.62 2879.38,3843.62 2903.58,3819.42 3124.81,3819.42 3151,3845.61 3151,3961.66 3190.08,4000.74 3462,4000.74 3462,3663.92 3179.96,3663.92 3154,3637.96 3154,3433 3113.87,3392.87 2538.04,3392.87 2469.17,3324
GSM_PWR on PWR "GSM_PWR_L03_P045" (solid, pour order 45): 3462,3663.92 3181.32,3663.92 3155.36,3637.96 3154,3637.96 3154,3363.01 3114.61,3323.62 3114.61,3153.62 3075.99,3115 2430.84,3115 2401.84,3086 2401.84,2960.07 2429.9,2932 2722.99,2932 2796,2858.99 2796,1513 3002,1513 3030,1485 3030,1108 3078,1060 3900,1060 3933,1093 3933,1231 3904,1260 3401.6,1260 3365,1296.6 3365,1570.69 3333.92,1601.78 3188.13,1601.78 3156,1633.91 3157.77,1635.68 3157.77,1750.57 3042.88,1750.57 3004,1789.46 3004,2801.11 3066.33,2863.44 3404.34,2863.44 3462,2921.1
CRNT_SNS.IP+_2 on PWR "CRNT_SNS.IP+_2_L03_P046" (solid, pour order 46): 218,1859.56 218,2041.27 256.3,2079.57 858.49,2079.57 925,2013.05 1493,2013.05 1522.76,1983.29 1522.76,1696.73 1494.09,1668.05 1096,1668.05 938,1826.05 251.51,1826.05
CRNT_SNS.IP+_1 on PWR "CRNT_SNS.IP+_1_L03_P047" (solid, pour order 47): 218,1372.51 218,1554.22 256.3,1592.51 858.49,1592.51 925,1526 1493,1526 1522.76,1496.24 1522.76,1209.67 1494.09,1181 1096,1181 938,1339 251.51,1339
5V on PWR "5V_L03_P048" (solid, pour order 48): 955.76,2578.76 1014.14,2637.14 1950.73,2637.14 1987,2600.87 1987,1269 2014.49,1241.51 2732.51,1241.51 2760.25,1269.25 2760.25,1477.25 2796,1513 3002,1513 3030,1485 3030,1108 3078,1060 3900,1060 3933,1093 3933,1231 3904,1260 3401.6,1260 3365,1296.6 3365,1570.69 3333.92,1601.78 3188.13,1601.78 3156,1633.91 3156,1748.8 3190.55,1783.35 4116.22,1783.35 4144.85,1754.71 4144.85,1191.23 4184.7,1151.38 4467.62,1151.38 4526.87,1092.13 4526.87,900.55 4488,861.68 4488,272.75 4520.75,240 7528.51,240 7569,280.49 7569,678.68 7586.32,696 7658.83,696 7676,678.83 7676,237 7575.85,136.85 4381.75,136.85 4351,167.6 4351,696 4322,725 2842,725 2808,759 2808,923 2771.84,959.16 1841.74,959.16 1812,988.91 1812,2094 1772,2134 1012,2134 955.76,2190.24
3V3 on PWR "3V3_L03_P049" (solid, pour order 49): 735.11,-102.18 735.11,78.9 788.45,132.24 2627.24,132.24 2768.03,273.03 3551.99,273.03 3609,216.03 3609,-109.43 742.36,-109.43
S_VIN on PWR "S_VIN_L03_P050" (solid, pour order 50): 276.7,387.7 606.03,387.7 669.1,324.64 1078.64,324.64 1267.5,513.5 1681.5,513.5 1711.01,543 1711.01,745.49 1745.52,780 1962.35,780 1991,751.35 1991,271 1963,243 567,243 511.17,187.17 280.92,187.17 255,213.09 255,366
VCC_M on PWR "VCC_M_L03_P051" (solid, pour order 51): 618.77,387.7 618.07,388.4 618.07,513.5 1267.5,513.5 1078.64,324.64 681.83,324.64
VCC#P on PWR "VCC#P_L03_P052" (solid, pour order 52): 653.42,518.27 618.07,553.62 618.07,649.38 724.17,755.48 1564.33,755.48 1590,729.81 1590,543 1565.27,518.27 656.87,518.27
5V on PWR "5V_L03_P054" (solid, pour order 54): 3642,4499.2 3775,4499.2 3775,3914.91 3821.91,3868 4382.06,3868 4424,3826.06 4424,3440.34 4459.97,3404.38 4904.62,3404.38 5019,3290 5978.77,3290 6019.38,3330.61 6019.38,3751.91 6044.47,3777 6188.94,3777 6211.44,3754.49 6211.44,3099.12 6161.33,3049 4911.35,3049 4760.35,3200 4358,3200 4299.61,3258.39 4299.61,3713.63 4258.25,3755 3687.67,3755 3642,3800.67 3642,4499.2 3772.13,4499.2 3775,4499.2
3V3_MCU on PWR "3V3_MCU_L03_P055" (solid, pour order 55): 3501.45,4498.93 3611.74,4498.93 3611.74,3788.5 3675.5,3724.74 4269.61,3724.74 4269.61,3222.72 4322.59,3169.74 4744.55,3169.74 4894.48,3019.8 5295.42,3019.8 5295.42,2497.97 4886.45,2089 3034.24,2089 3034.24,2787.65 3076.03,2829.44 3412.5,2829.44 3501.45,2918.39

## Text inside footprints (layer, text, board x,y; h text height)
J19: Top Overlay "Board Edge" at 3524.19,4736.38 h19.68
J27: Top Overlay "Board Edge" at 880.81,4719.44 h30
J30: Mechanical 13 "PCB Edge" at 4041,4736.94 h31.5
U28: Top Overlay "1" at 6317.87,3727.1 h39.37; Top Overlay "2" at 6317.87,3627.1 h39.37; Top Overlay "3" at 6316.87,3525.1 h39.37; Top Overlay "4" at 6317.87,3429.1 h39.37; Top Overlay "5" at 6325.75,3329.1 h39.37; Top Overlay "6" at 7158.87,3594.1 h39.37; Top Overlay "7" at 7166.75,3691.1 h39.37; Top Overlay "8" at 7158.87,3492.1 h39.37